# Altium PCB ika_pcb.PcbDoc (part 1 of 3)
Units mil, origin at the board's own origin, x right, y up, seen from the top; angles counter-clockwise.
Board outline 5430 x 4360 mil, 2 copper layers (Top Layer, Bottom Layer); 129 components, 109 nets, 436 pads, 110 vias.
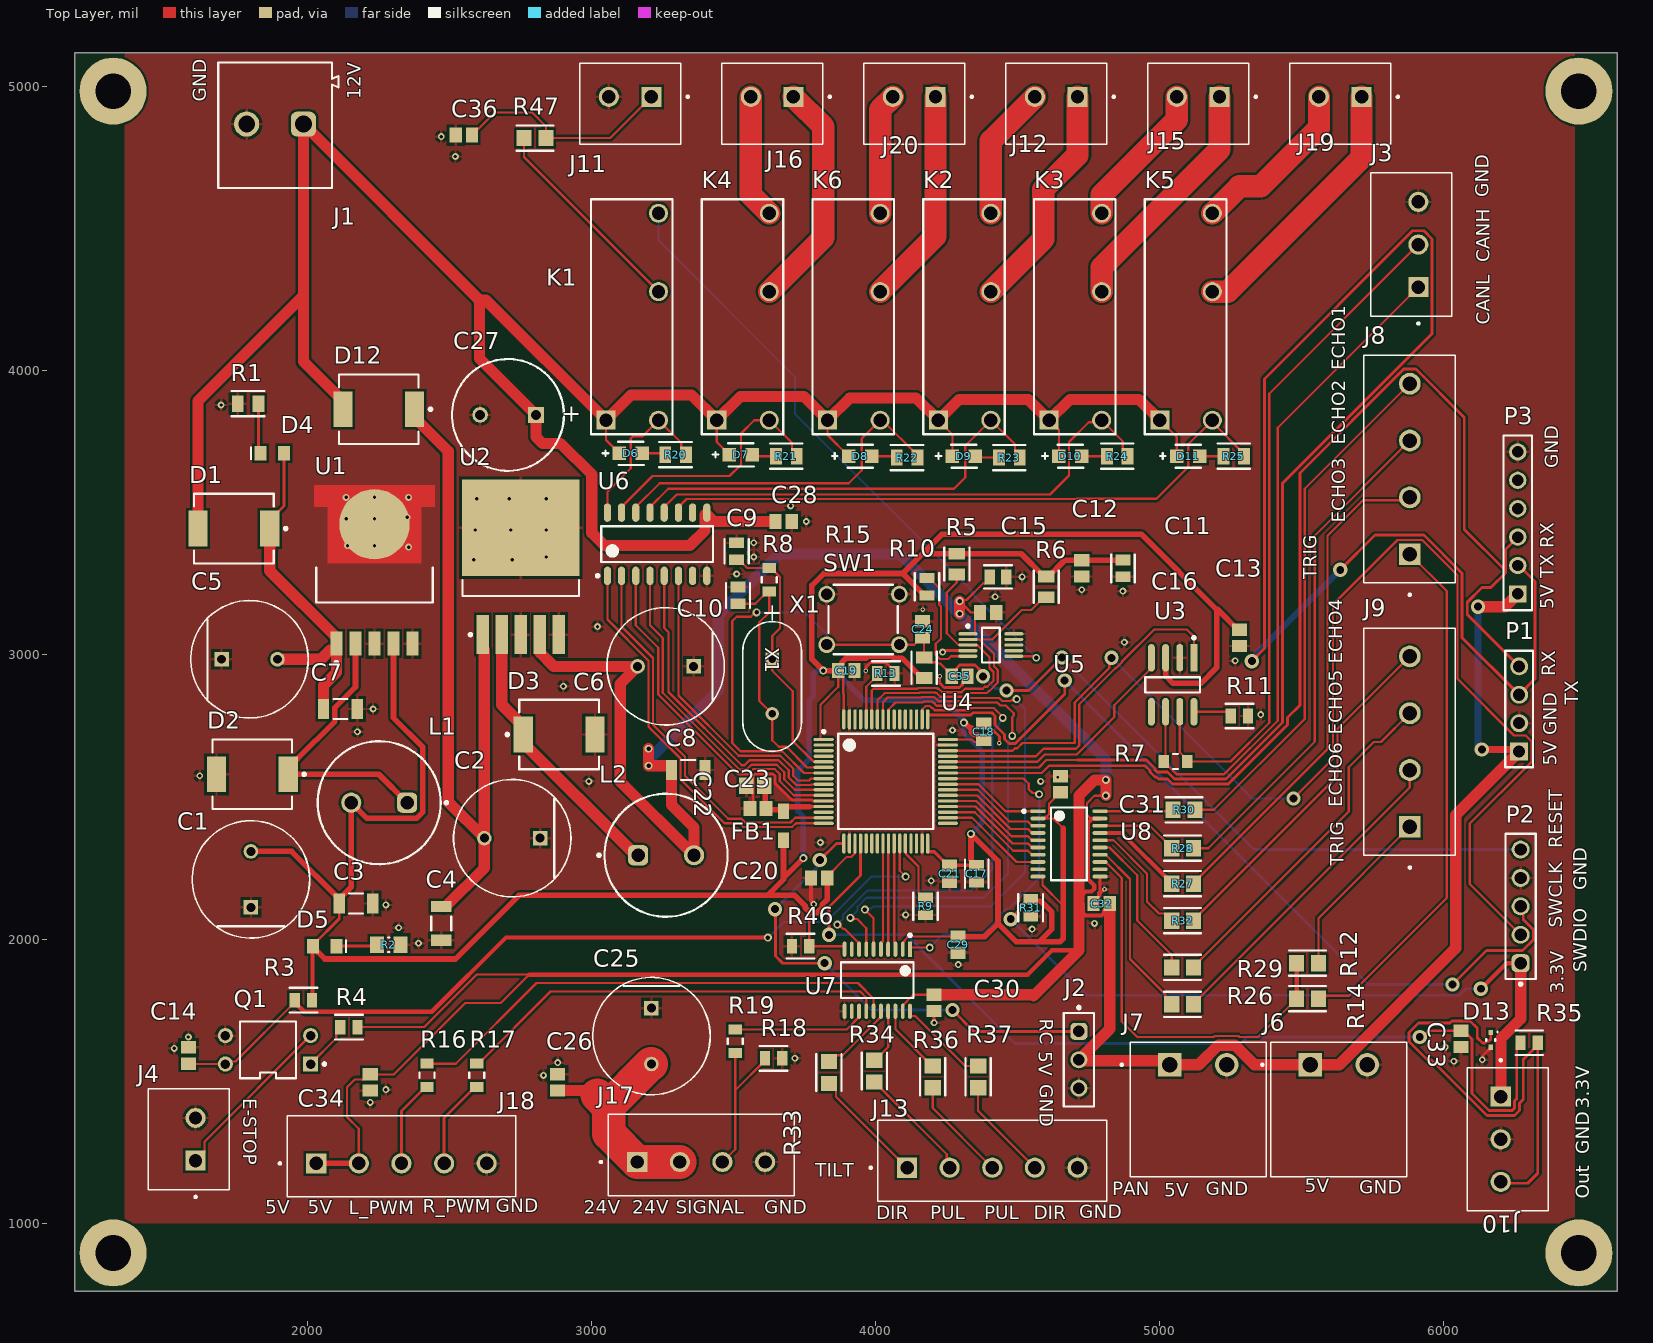
[diagram p0: Top Layer view]
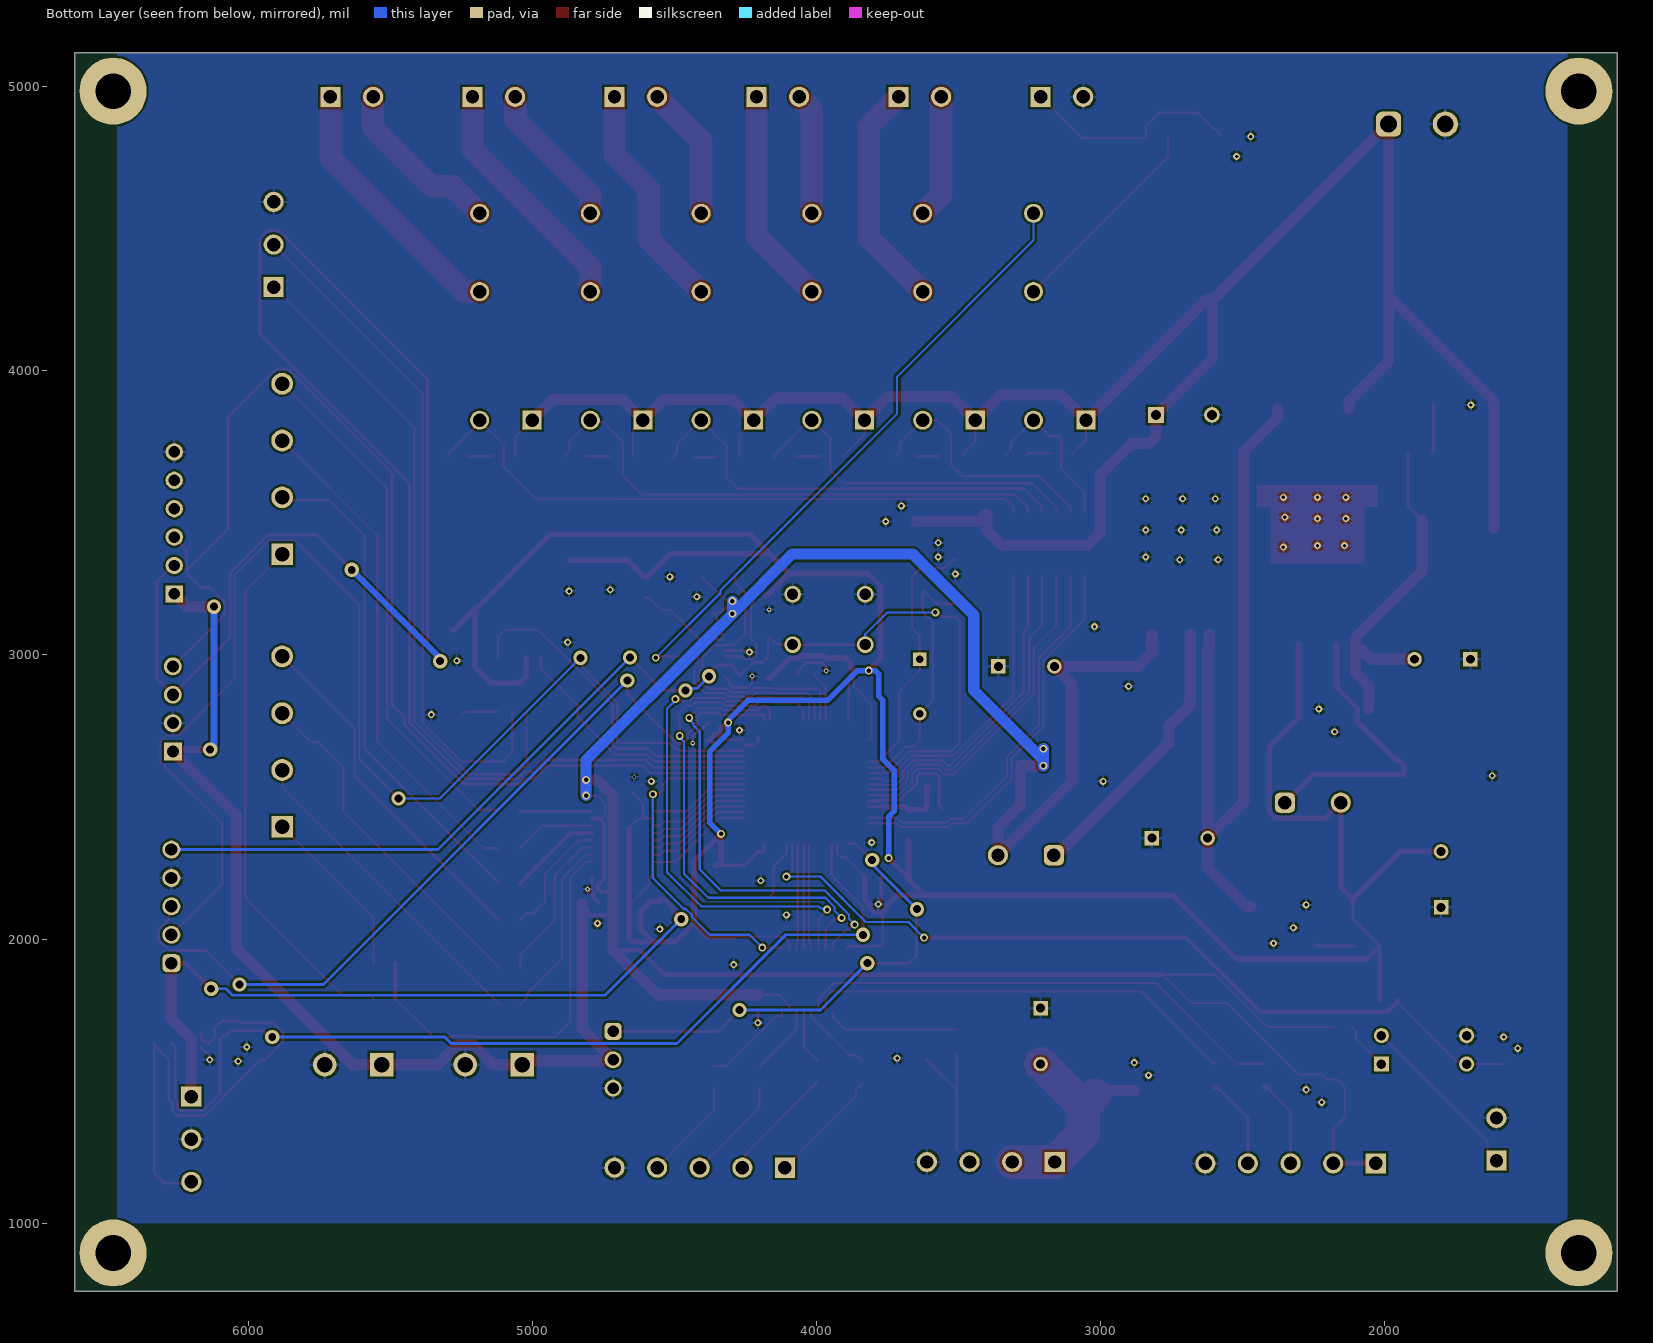
[diagram p1: Bottom Layer view, seen from below]
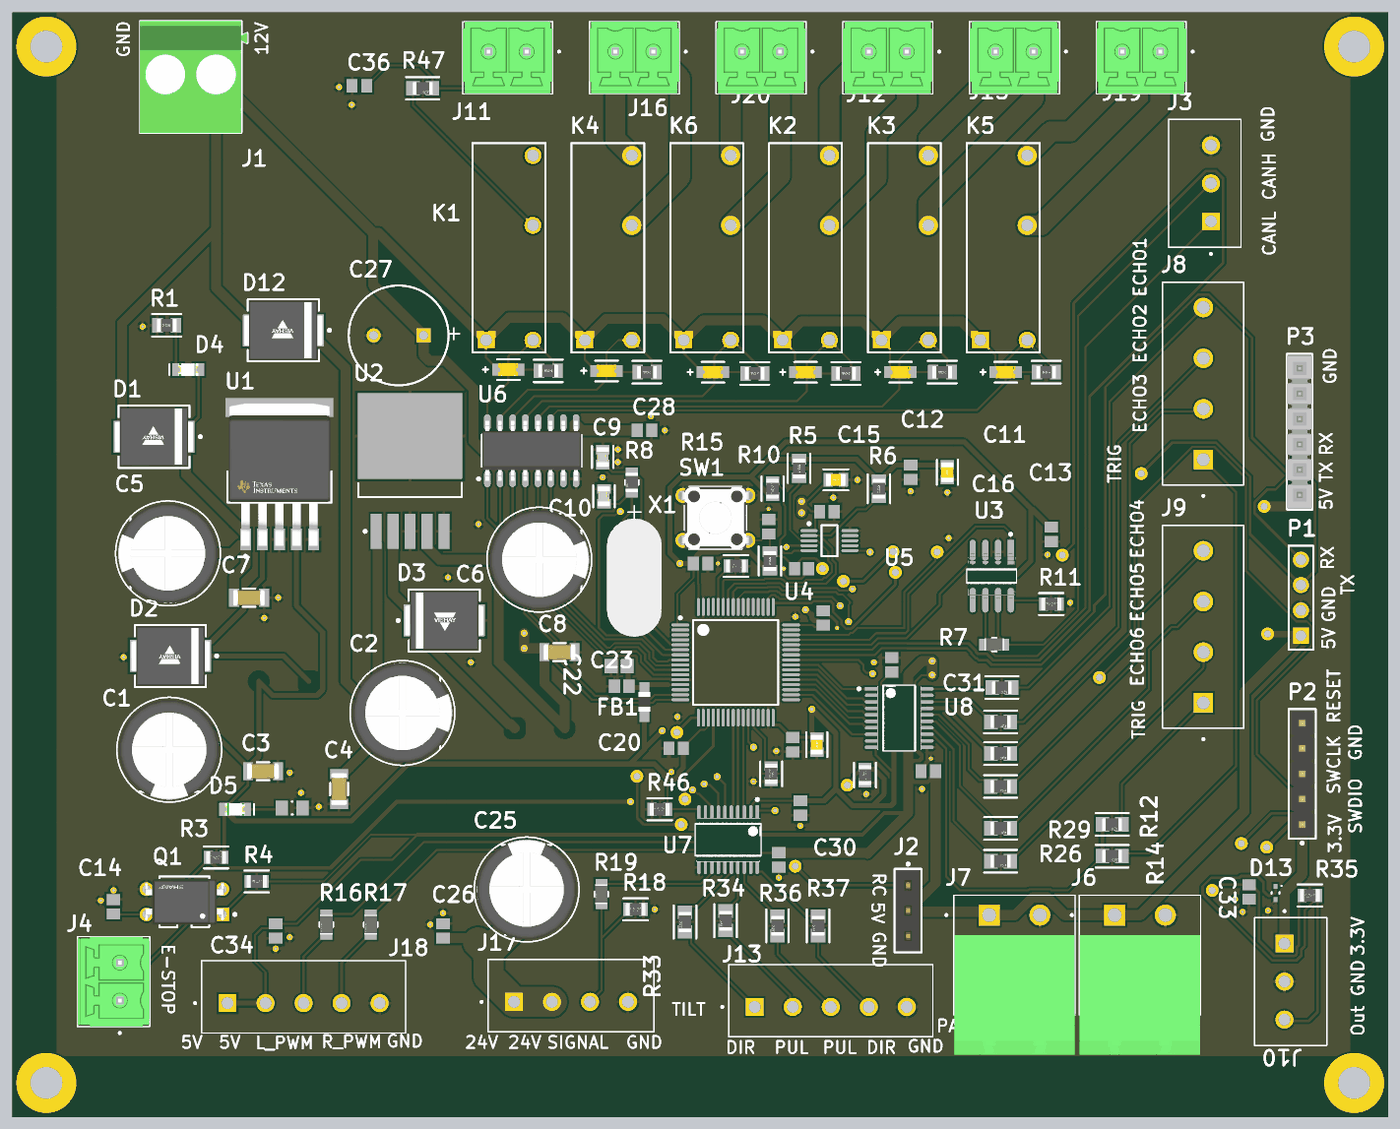
[diagram p3: 3D render of the assembled board from above, using the file's embedded part models]

## Layer stack, top to bottom
Top Solder: solder mask 0.4, Solder Resist, Dk 3.5
Top Layer: signal copper 1.4
Dielectric 1: dielectric 12.6, FR-4, Dk 4.8
Bottom Layer: signal copper 1.4
Bottom Solder: solder mask 0.4, Solder Resist, Dk 3.5

## Board outline
1180,760 6610,760 6610,5120 1180,5120

## Design rules (kind name [scope] priority, off if disabled: settings)
Clearance [All] p1: gap=7.87 ignorepadtopadclearanceinfootprint=FALSE
ComponentClearance [NOT (InComponent('J6') OR InComponent('J7') OR InComponent('J8') OR InComponent('J9'))] p1: gap=10 collisioncheckmode=3 verticalgap=10 showdistances=FALSE
HoleSize [All] p1: absolutevalues=TRUE maxlimit=196.85 minlimit=1 maxpercent=80.000 minpercent=20.000
MinimumSolderMaskSliver [All] p1: minsoldermaskwidth=0
PolygonConnect [All] p1: connectstyle=Relief reliefconductorwidth=10 reliefentries=4 polygonreliefangle="90 Angle" airgapwidth=10
RoutingVias [All] p1: holewidth=28 width=50 viastyle="Through Hole" minholewidth=28 minwidth=50 maxholewidth=28 maxwidth=50
SilkToSilkClearance [All] p1: silktosilkclearance=0
SilkToSolderMaskClearance [IsPad] p1: minsilkscreentomaskgap=0 clearancetoexposedcopper=TRUE
SolderMaskExpansion [All] p1: expansion=0 istentingtop=FALSE
SupplyNets "Schematic Supply Nets" [InNet('GND')] p1: voltage=0.000
Width [All] p1: maxlimit=118.11 minlimit=4 preferedwidth=40 minimp=50.000000 maximp=50.000000 favimp=50.000000
25 further rules are at their usual default settings.

## Components (designator, comment, footprint, x,y, rotation, side; value= is the part's Value field where it differs from the comment)
C1 "ECA1HHG331B" FP-RAD-TH-D_10_0_5-L_16_1-MFG 1800,2210 r90 top
C2 "EEUFM1E681" FP-RAD-TH-D_10_0_5-L_20_2-MFG 2720,2355 r180 top
C3 "CC1206KPX7R9BB104" FP-CC1206-1_25-MFG 2170,2125 r0 top value="100 nF"
C4 "CC1206KPX7R9BB104" FP-CC1206-1_25-MFG 2470,2055 r270 top value="100 nF"
C5 "EEUFM1E681" FP-RAD-TH-D_10_0_5-L_20_2-MFG 1795,2985 r0 top
C6 "ECA1HHG331B" FP-RAD-TH-D_10_0_5-L_16_1-MFG 3260,2960 r180 top
C7 "CC1206KPX7R9BB104" FP-CC1206-1_25-MFG 2115,2810 r0 top value="100 nF"
C8 "CC1206KPX7R9BB104" FP-CC1206-1_25-MFG 3340,2595 r0 top value="100 nF"
C9 "C0805C220K3HACTU" FP-C0805C-DN-MFG 3510,3365 r270 top value="22 pF"
C10 "C0805C220K3HACTU" FP-C0805C-DN-MFG 3515,3210 r270 top value="22 pF"
C11 "C0805C106J8RACAUTO" FP-C0805C106J8RACAUTO-MFG 4870,3305 r270 top
C12 "VJ0805Y104MXAMT" CAPC2013X145X48LL20T23 4725,3305 r90 top
C13 "VJ0805Y104MXAMT" CAPC2013X145X48LL20T23 5280,3060 r270 top
C14 "100 nF" CAPC2013X145X48LL20T23 1580,1590 r270 top
C15 "C0805C106J8RACAUTO" FP-C0805C106J8RACAUTO-MFG 4430,3275 r0 top
C16 "VJ0805Y104MXAMT" CAPC2013X145X48LL20T23 4395,3150 r180 top
C17 "C0805C106J8RACAUTO" FP-C0805C106J8RACAUTO-MFG 4355,2230 r270 top
C18 "VJ0805Y104MXAMT" CAPC2013X145X48LL20T23 4380,2730 r270 top
C19 "100 nF" CAPC2013X145X48LL20T23 3896.46,2945 r180 top
C20 "VJ0805Y104MXAMT" CAPC2013X145X48LL20T23 3800,2215 r0 top
C21 "VJ0805Y104MXAMT" CAPC2013X145X48LL20T23 4260,2230 r90 top
C22 "C0805C105J3RACTU" CAPC2013X145X50NL20T25 3575,2540 r0 top
C23 "08051C103JAT2A" CAPC2013X94X50LL20T25 3585,2460 r0 top
C24 "VJ0805Y104MXAMT" CAPC2013X145X48LL20T23 4165,3090 r270 top
C25 "EEUFK1V102L" FP-RAD-TH-D_10_0_5-L_30_2-MFG 3210,1658.43 r270 top
C26 "100nF" CAPC2013X145X48LL20T23 2880,1495 r270 top
C27 "ECA-2AM101" CAPPR65-500-1600X1000X1700 2705,3845 r180 top
C28 "VJ0805Y104MXAMT" CAPC2013X145X48LL20T23 3675,3470 r180 top
C29 "VJ0805Y104MXAMT" CAPC2013X145X48LL20T23 4290,1980 r90 top
C30 "VJ0805Y104MXAMT" CAPC2013X145X48LL20T23 4205,1775 r90 top
C31 "VJ0805Y104MXAMT" CAPC2013X145X48LL20T23 4650,2545 r270 top
C32 "VJ0805Y104MXAMT" CAPC2013X145X48LL20T23 4795,2125 r0 top
C33 "VJ0805Y104MXAMT" CAPC2013X145X48LL20T23 6060,1648.54 r90 top
C34 "100nF" CAPC2013X145X48LL20T23 2220,1495 r270 top
C35 "08053D105MAT2A" CAPC2013X140X50LL20T25 4295,2925 r180 top
C36 "VJ0805Y104MXAMT" CAPC2013X145X48LL20T23 2550,4830 r0 top
D1 "SS34-E3/9AT" FP-SMC-MFG 1740,3445 r180 top
D2 "SS34-E3/9AT" FP-SMC-MFG 1805,2580 r180 top
D3 "SS34-E3/9AT" FP-SMC-MFG 2885,2720 r0 top
D4 "150080SS75000" WL-SMCW_0805_150080xx75000 1875,3710 r0 top
D5 "150080GS75000" WL-SMCW_0805_150080xx75000 2060,1975 r180 top
D6 "SM0805YCL" FP-SM0805YCL-MFG 3137.5,3710 r0 top
D7 "SM0805YCL" FP-SM0805YCL-MFG 3525,3705 r0 top
D8 "SM0805YCL" FP-SM0805YCL-MFG 3945,3700 r0 top
D9 "SM0805YCL" FP-SM0805YCL-MFG 4310,3700 r0 top
D10 "SM0805YCL" FP-SM0805YCL-MFG 4685,3700 r0 top
D11 "SM0805YCL" FP-SM0805YCL-MFG 5100,3700 r0 top
D12 "SS34-E3/9AT" FP-SMC-MFG 2250,3865 r180 top
D13 "ESD5Z3.3T1G" ONSC-SOD-523-2-502-01_V 6165,1645 r270 top
FB1 "742792040" WE-CBF_0805_L2W1.2H0.9_HC 3675,2398.82 r90 top
J1 "691253510002" 691253510002 1885,4865 r180 top
J2 "61300311821" 61300311821 4715,1575 r270 top
J3 "1803439" PHOENIX_1803439 6028.11,4192.64 r90 top
J4 "1803426" PHOENIX_1803426 1723.11,1117.64 r90 top
J6 "1736036" PHOENIX_1736036 5630,1400 r0 top
J7 "1736036" PHOENIX_1736036 5135,1400 r0 top
J8 "1729144" PHOENIX_1729144 6039.45,3255 r90 top
J9 "1729144" PHOENIX_1729144 6039.45,2295 r90 top
J10 "1803439" PHOENIX_1803439 6081.89,1547.36 r270 top
J11 "1803426" PHOENIX_1803426 3312.36,5083.11 r180 top
J12 "1803426" PHOENIX_1803426 4812.36,5083.11 r180 top
J13 "1803455" PHOENIX_1803455 4007.64,1076.89 r0 top
J15 "1803426" PHOENIX_1803426 5312.36,5083.11 r180 top
J16 "1803426" PHOENIX_1803426 3812.36,5083.11 r180 top
J17 "1803442" PHOENIX_1803442 3057.64,1096.89 r0 top
J18 "1803455" PHOENIX_1803455 1927.64,1091.89 r0 top
J19 "1803426" PHOENIX_1803426 5812.36,5083.11 r180 top
J20 "1803426" PHOENIX_1803426 4312.36,5083.11 r180 top
K1 "ALDP112W" PNSC-LD-P-4-2050x720x1530_V 3049.96,3826.65 r90 top
K2 "ALDP112W" PNSC-LD-P-4-2050x720x1530_V 4219.96,3826.65 r90 top
K3 "ALDP112W" PNSC-LD-P-4-2050x720x1530_V 4609.96,3826.65 r90 top
K4 "ALDP112W" PNSC-LD-P-4-2050x720x1530_V 3439.96,3826.65 r90 top
K5 "ALDP112W" PNSC-LD-P-4-2050x720x1530_V 4999.96,3826.65 r90 top
K6 "ALDP112W" PNSC-LD-P-4-2050x720x1530_V 3829.96,3826.65 r90 top
L1 "7447471330" WE-TIS_1111 -47748.43,-47520 r180 top
L2 "7447471330" WE-TIS_1111 53261.57,52295 r0 top
P1 "PHT-104-01-L-S" SMTC-PHT-104-01-X-S 6265,2660 r90 top
P2 "61300511121" 61300511121 6270,2115 r90 top
P3 "TSW-106-23-F-S" SMTC-TSW-106-23-X-S 6260,3215 r90 top
Q1 "PC817X1J000F" FP-PC817X1J000F-MFG 1860,1610 r180 top
R1 "RN73R2ATTD2201B10" FP-RN73R2A-IPC_B 1790,3885 r0 top
R2 "470R 5% 0805(2012)" RESC0805(2012)_M 2285,1980 r180 top value="470.00 Ohm"
R3 "CRGCQ0805J10K" FP-CRGCQ0805-IPC_C 1985,1785 r180 top value=10KΩ
R4 "CRGCQ0805F1K0" FP-CRGCQ0805-IPC_C 2145,1690 r180 top value=1KΩ
R5 "RN73R2ATTD2201B10" FP-RN73R2A-IPC_B 4285,3320 r90 top
R6 "RN73R2ATTD2201B10" FP-RN73R2A-IPC_B 4600,3240 r90 top
R7 "AC0805JR-07120RL" FP-AC0805-MFG 5055,2625 r0 top value=120Ω
R8 "AF0805FR-071ML" FP-AF0805-MFG 3625,3265 r270 top
R9 "CRGCQ0805J10K" FP-CRGCQ0805-IPC_C 4175,2115 r270 top value=10KΩ
R10 "CRGCQ0805F100K" FP-CRGCQ0805-IPC_C 4180,3240 r270 top value=100KΩ
R11 "CRGCQ0805J10K" FP-CRGCQ0805-IPC_C 5280,2785 r180 top value=10KΩ
R12 "RMCF0805FT100R" FP-RMCF0805-IPC_A 5520,1915 r0 top
R13 "CRGCQ0805J10K" FP-CRGCQ0805-IPC_C 4035.55,2935 r0 top value=10KΩ
R14 "RMCF0805FT100R" FP-RMCF0805-IPC_A 5520,1790 r0 top
R15 "RN73R2ATTD2201B10" FP-RN73R2A-IPC_B 4170,2955 r90 top
R16 "AC0805FR-07220RL" FP-AC0805-MFG 2420,1520 r270 top value=220Ω
R17 "AC0805FR-07220RL" FP-AC0805-MFG 2595,1520 r270 top value=220Ω
R18 "CRGCQ0805J10K" FP-CRGCQ0805-IPC_C 3640,1580 r180 top value=10KΩ
R19 "AC0805FR-07220RL" FP-AC0805-MFG 3505,1640 r270 top value=220Ω
R20 "RN73R2ATTD2201B10" FP-RN73R2A-IPC_B 3295,3705 r180 top
R21 "RN73R2ATTD2201B10" FP-RN73R2A-IPC_B 3685,3700 r180 top
R22 "RN73R2ATTD2201B10" FP-RN73R2A-IPC_B 4110,3695 r180 top
R23 "RN73R2ATTD2201B10" FP-RN73R2A-IPC_B 4470,3695 r180 top
R24 "RN73R2ATTD2201B10" FP-RN73R2A-IPC_B 4850,3700 r180 top
R25 "RN73R2ATTD2201B10" FP-RN73R2A-IPC_B 5260,3700 r180 top
R26 "RMCF0805FT100R" FP-RMCF0805-IPC_A 5080,1770 r0 top
R27 "RMCF0805FT100R" FP-RMCF0805-IPC_A 5080,2195 r0 top
R28 "RMCF0805FT100R" FP-RMCF0805-IPC_A 5080,2320 r0 top
R29 "RMCF0805FT100R" FP-RMCF0805-IPC_A 5080,1900 r0 top
R30 "RMCF0805FT100R" FP-RMCF0805-IPC_A 5085,2455 r0 top
R31 "CRGCQ0805J10K" FP-CRGCQ0805-IPC_C 4545,2110 r90 top value=10KΩ
R32 "RMCF0805FT100R" FP-RMCF0805-IPC_A 5080,2065 r0 top
R33 "RMCF0805FT100R" FP-RMCF0805-IPC_A 3835,1530 r270 top
R34 "RMCF0805FT100R" FP-RMCF0805-IPC_A 3995,1535 r270 top
R35 "CRGCQ0805F1K0" FP-CRGCQ0805-IPC_C 6300,1635 r180 top value=1KΩ
R36 "RMCF0805FT100R" FP-RMCF0805-IPC_A 4200,1515 r270 top
R37 "RMCF0805FT100R" FP-RMCF0805-IPC_A 4360,1515 r270 top
R46 "CRGCQ0805J10K" FP-CRGCQ0805-IPC_C 3735,1975 r180 top value=10KΩ
R47 "RMCF0805FT100R" FP-RMCF0805-IPC_A 2800,4820 r0 top
SW1 "430156043736" 430156043736 3955,3125 r0 top
U1 "LM2596SX-3.3/NOPB" FP-KTT0005B-MFG 2235,3360.08 r0 top
U2 "LM2596SX-5.0" TS5B_M 2750,3310 r90 top
U3 "SN65HVD230DR" FP-D0008A-IPC_A 5045,2895 r270 top
U4 "STM32F103RET6" STM-LQFP64_N 4035,2555 r0 top
U5 "MCP4728-E/UN" MSOP-UN10_N 4405,3035 r0 top
U6 "ULN2003ADR" D0016A_M 3230,3390 r90 top
U7 "TXS0108EPWR" FP-PW0020A-IPC_C 4005,1855 r270 top
U8 "TXS0108EPWR" FP-PW0020A-IPC_C 4680,2335 r0 top
X1 "AS-8.000-18-SP" XTAL_AS_SP_RAL 3635,2985 r270 top

## Footprints (in the part's own frame and the unit in brackets; to place one, negate y for a bottom-side part, rotate by r counter-clockwise, add the part's x,y. Pads: shape width x height; smd on the part's side, far side on the other; paste and mask are expansions set on the pad)
61300311821 [mm] "Socket Header, Pitch 2.54 mm, THT, Vertical, single row, 3p"
  rrect50% 1.52x1.52 hole 1.02: 1(-2.54,0)
  round 1.52 hole 1.02: 2(0,0) 3(2.54,0)
  silkscreen extent -4.79,-1.35 4.19,1.35, body extent -4.06,-1.25 4.06,1.25, height 8.55
61300511121 [mm] "Pin Header, pitch 2.54 mm, THT, Vertical, single row, 5p"
  rrect50% 1.6x1.6 hole 1.1: 1(-5.08,0)
  round 1.6 hole 1.1: 2(-2.54,0) 3(0,0) 4(2.54,0) 5(5.08,0)
  silkscreen extent -7.07,-1.35 6.5,1.35, body extent -6.35,-1.27 6.35,1.27, height 8.57
430156043736 [mm] "6x6mm Tact Switch, THT version"
  round 1.5 hole 1: A1(-3.25,2.25) A2(3.25,2.25) B1(-3.25,-2.25) B2(3.25,-2.25)
  silkscreen extent -3.1,-3.1 3.1,3.1, body extent -3.95,-3.1 3.95,3.1, height 4.35
691253510002 [mm] "Serie 2535 - 5.08 mm _ 2 pins"
  rrect50% 2.25x2.25 hole 1.5: 1(-2.54,-0.1)
  round 2.25 hole 1.5: 2(2.54,-0.1)
  silkscreen extent -5.67,-5.6 5.08,5.6, body extent -5.67,-5.6 5.09,5.6, height 18.1
CAPC2013X94X50LL20T25 [mm] "Chip Capacitor, 2-Leads, Body 2.01x1.25mm, IPC High Density"
  rect 1.15x1.35 smd: 1(-0.725,0) 2(0.725,0)
  body extent -1.1,-0.72 1.1,0.72, height 0.94
CAPC2013X140X50LL20T25 [mm] "Chip Capacitor, 2-Leads, Body 2.00x1.25mm, IPC High Density"
  rect 1.1x1.35 smd: 1(-0.7,0) 2(0.7,0)
  body extent -1.1,-0.72 1.1,0.72, height 1.4
CAPC2013X145X48LL20T23 [mm] "Chip Capacitor, 2-Leads, Body 2.00x1.25mm, IPC High Density"
  rect 1.1x1.35 smd: 1(-0.725,0) 2(0.725,0)
  body extent -1.1,-0.72 1.1,0.72, height 1.45
CAPC2013X145X50NL20T25 [mm] "Chip Capacitor, 2-Leads, Body 2.00x1.25mm, IPC Medium Density"
  rect 1.3x1.45 smd: 1(-0.8,0) 2(0.8,0)
  body extent -1.1,-0.72 1.1,0.72, height 1.45
CAPPR65-500-1600X1000X1700 [mm] "THD, 2-Leads, Dia 10mm, Body Length 16mm"
  rect 1.4x1.4 hole 0.9: 1(-2.5,0)
  round 1.4 hole 0.9: 2(2.5,0)
  silkscreen extent -5,-5 5,5, body extent -5,-5 5,5, height 17
D0016A_M [mm] "SOIC, 16-Leads, Body 10x4mm, Pitch 1.27mm, IPC Low Density"
  oval 1.65x0.65 smd: 1(-2.825,4.445) 2(-2.825,3.175) 3(-2.825,1.905) 4(-2.825,0.635) 5(-2.825,-0.635) 6(-2.825,-1.905) 7(-2.825,-3.175) 8(-2.825,-4.445) 9(2.825,-4.445) 10(2.825,-3.175) 11(2.825,-1.905) 12(2.825,-0.635) 13(2.825,0.635) 14(2.825,1.905) 15(2.825,3.175) 16(2.825,4.445)
  silkscreen extent -2.95,-5 1.6,5.44, body extent -3,-4.95 3,4.95, height 1.59
FP-AC0805-MFG [mm]
  rect 0.9x1.2 smd paste+0 mask+0: 1(-1.05,0) 2(1.05,0)
  silkscreen extent -0.23,-0.67 0.23,0.67, body extent -1.6,-0.77 1.6,0.77, height 0.25
FP-AF0805-MFG [mm]
  rect 0.9x1.2 smd paste+0 mask+0: 1(-1.05,0) 2(1.05,0)
  silkscreen extent -0.23,-0.67 0.23,0.67, body extent -1.6,-0.77 1.6,0.77, height 0.25
FP-C0805C106J8RACAUTO-MFG [mm]
  rect 0.95x1.35 smd paste+0 mask+0: 1(-0.75,0) 2(0.75,0)
  silkscreen extent -1.25,-1.05 1.25,1.05, body extent -1.4,-0.85 1.4,0.85, height 0.25
FP-C0805C-DN-MFG [mm]
  rect 0.95x1.35 smd paste+0 mask+0: 1(-0.75,0) 2(0.75,0)
  silkscreen extent -1.1,-1.07 1.1,1.07, body extent -1.4,-0.85 1.4,0.85, height 0.25
FP-CC1206-1_25-MFG [mm]
  rect 1x1.8 smd paste+0 mask+0: 1(-1.5,0) 2(1.5,0)
  silkscreen extent -0.63,-0.9 0.63,0.9, body extent -2.2,-1.25 2.2,1.25, height 0.25
FP-CRGCQ0805-IPC_C [mil]
  rect 35.67x51.57 smd paste+0 mask+0: 1(-30.55,0) 2(30.55,0)
  silkscreen extent -48,-43 48,43, body extent -52,-31 52,31, height 10
FP-D0008A-IPC_A [mil]
  rect 97.21x24.49 smd paste+0 mask+0: 1(-95.02,75)
  rrect100% 97.21x24.49 smd paste+0 mask+0: 2(-95.02,25) 3(-95.02,-25) 4(-95.02,-75) 5(95.02,-75) 6(95.02,-25) 7(95.02,25) 8(95.02,75)
  silkscreen extent -170,-97 27,97, body extent -163,-116 163,116, height 10
FP-KTT0005B-MFG [mm]
  rect 1.07x2.16 smd paste+0 mask+0: 1(-3.4,-8.13) 2(-1.7,-8.13) 3(0,-8.13) 4(1.7,-8.13) 5(3.4,-8.13)
  round 6.291 smd paste+0 mask+0: 6(0,2.545)
  Top Layer region: -5.4,6.04 5.4,6.04 5.4,4.13 4.165,4.13 4.165,-0.95 -4.165,-0.95 -4.165,4.13 -5.4,4.13 -5.4,6.04
  silkscreen extent -5.21,-9.95 5.21,-1.33, body extent -5.5,-9.31 5.5,6.14, height 0.25
FP-PC817X1J000F-MFG [mm]
  rect 1.35x1.35 hole 0.85 paste-2539.97 mask+0: 1(-3.81,1.27)
  round 1.35 hole 0.85 paste-2539.97 mask+0: 2(-3.81,-1.27) 3(3.81,-1.27) 4(3.81,1.27)
  silkscreen extent -5.18,-2.54 2.5,2.54, body extent -4.58,-2.64 4.58,2.64, height 0.25
FP-PW0020A-IPC_C [mm]
  rect 1.355x0.341 smd paste+0 mask+0: 1(-2.775,2.925)
  rrect100% 1.355x0.341 smd paste+0 mask+0: 2(-2.775,2.275) 3(-2.775,1.625) 4(-2.775,0.975) 5(-2.775,0.325) 6(-2.775,-0.325) 7(-2.775,-0.975) 8(-2.775,-1.625) 9(-2.775,-2.275) 10(-2.775,-2.925) 11(2.775,-2.925) 12(2.775,-2.275) 13(2.775,-1.625) 14(2.775,-0.975) 15(2.775,-0.325) 16(2.775,0.325) 17(2.775,0.975) 18(2.775,1.625) 19(2.775,2.275) 20(2.775,2.925)
  silkscreen extent -4.15,-3.25 1.6,3.25, body extent -3.55,-3.35 3.55,3.35, height 0.25
FP-RAD-TH-D_10_0_5-L_16_1-MFG [mm]
  rect 1.3x1.3 hole 0.8 paste-2539.97 mask+0: 1(-2.5,0)
  round 1.3 hole 0.8 paste-2539.97 mask+0: 2(2.5,0)
  silkscreen extent -5.25,-5.25 5.25,5.25, body extent -5.35,-5.35 5.35,5.35, height 0.25
FP-RAD-TH-D_10_0_5-L_20_2-MFG [mm]
  rect 1.3x1.3 hole 0.8 paste-2539.97 mask+0: 1(-2.5,0)
  round 1.3 hole 0.8 paste-2539.97 mask+0: 2(2.5,0)
  silkscreen extent -5.25,-5.25 5.25,5.25, body extent -5.35,-5.35 5.35,5.35, height 0.25
FP-RAD-TH-D_10_0_5-L_30_2-MFG [mm]
  rect 1.3x1.3 hole 0.8 paste-2539.97 mask+0: 1(-2.5,0)
  round 1.3 hole 0.8 paste-2539.97 mask+0: 2(2.5,0)
  silkscreen extent -5.25,-5.25 5.25,5.25, body extent -5.35,-5.35 5.35,5.35, height 0.25
FP-RMCF0805-IPC_A [mil]
  rect 53.33x57.56 smd paste+0 mask+0: 1(-38.42,0) 2(38.42,0)
  silkscreen extent -65,-45 65,45, body extent -85,-48 85,48, height 10
FP-RN73R2A-IPC_B [mil]
  rect 41.54x57.33 smd paste+0 mask+0: 1(-36.44,0) 2(36.44,0)
  silkscreen extent -57,-44 57,44, body extent -67,-39 67,39, height 10
FP-SM0805YCL-MFG [mil]
  rect 47x47 smd paste+0 mask+0: 1(-40.5,0) 2(40.5,0)
  silkscreen extent -100,-41 45,40, body extent -68,-33 68,33, height 10
FP-SMC-MFG [mm]
  rect 1.72x3.2 smd paste+0 mask+0: 1(-3.205,0) 2(3.205,0)
  silkscreen extent -4.75,-3.11 3.55,3.11, body extent -4.17,-3.21 4.17,3.21, height 0.25
MSOP-UN10_N [mm] "TSSOP, 10-Leads, Body 3x3mm, Pitch 0.5mm, IPC Medium Density"
  oval 1.7x0.3 smd: 1(-2.05,1) 2(-2.05,0.5) 3(-2.05,0) 4(-2.05,-0.5) 5(-2.05,-1) 6(2.05,-1) 7(2.05,-0.5) 8(2.05,0) 9(2.05,0.5) 10(2.05,1)
  silkscreen extent -2.17,-1.55 0.8,1.82, body extent -1.55,-1.55 1.55,1.55, height 1.1
ONSC-SOD-523-2-502-01_V [mm] "SOD, 2-Leads, Body 1.2x0.8mm"
  rect 0.48x0.4 smd: 1(-0.66,0) 2(0.66,0)
  silkscreen extent -0.75,-0.4 0.07,0.65, body extent -0.6,-0.4 0.6,0.4, height 0.7
PHOENIX_1729144 [mm]
  rect 1.95x1.95 / inner round 1.95 / far side rect 1.95x1.95 hole 1.3: 1(2.54,4.05)
  round 1.95 hole 1.3: 2(7.62,4.05) 3(12.7,4.05) 4(17.78,4.05)
  silkscreen extent -1.2,0 20.32,8.15
PHOENIX_1736036 [mm]
  rect 2.1x2.1 / inner round 2.1 / far side rect 2.1x2.1 hole 1.4: 1(-2.54,4)
  round 2.1 hole 1.4: 2(2.54,4)
  silkscreen extent -6.93,-6 6.08,6, body extent -6.04,-10 6.04,2, height 8.6
PHOENIX_1803426 [mm]
  rect 1.8x1.8 / inner round 1.8 / far side rect 1.8x1.8 hole 1.2: 01(2.6,3)
  round 1.8 hole 1.2: 02(6.41,3)
  silkscreen extent -0.75,0 9.01,7.25, body extent 0,0 9.01,7.25, height 9.2
PHOENIX_1803439 [mm]
  rect 1.8x1.8 / inner round 1.8 / far side rect 1.8x1.8 hole 1.2: 01(2.6,3)
  round 1.8 hole 1.2: 02(6.41,3) 03(10.22,3)
  silkscreen extent -0.75,0 12.82,7.25
PHOENIX_1803442 [mm]
  rect 1.8x1.8 / inner round 1.8 / far side rect 1.8x1.8 hole 1.2: 01(2.6,3)
  round 1.8 hole 1.2: 02(6.41,3) 03(10.22,3) 04(14.03,3)
  silkscreen extent -0.75,0 16.63,7.25
PHOENIX_1803455 [mm]
  rect 1.8x1.8 / inner round 1.8 / far side rect 1.8x1.8 hole 1.2: 01(2.6,3)
  round 1.8 hole 1.2: 02(6.41,3) 03(10.22,3) 04(14.03,3) 05(17.84,3)
  silkscreen extent -0.75,0 20.44,7.25
PNSC-LD-P-4-2050x720x1530_V [mm] "LD-P, 4-Leads, Body 20.5x7.2mm"
  rect 1.7x1.7 hole 1.2 mask+0.102: 1(0,0)
  round 1.7 hole 1.2 mask+0.102: 2(18.5,-4.7) 3(11.5,-4.7) 4(0,-4.7)
  silkscreen extent -1.25,-5.95 19.75,1.35, body extent -1.05,-5.85 19.45,1.35, height 15.3
RESC0805(2012)_M [mm] "Chip Resistor, Body 2.0x1.3mm, IPC Low Density"
  rect 1.25x1.5 smd: 1(-1.05,0) 2(1.05,0)
  silkscreen extent -0.05,-0.65 0.05,0.65, body extent -1.1,-0.67 1.1,0.67, height 0.7
SMTC-PHT-104-01-X-S [mm] "Press Fit Socket Assembly, 1x4 Pins, Vertical, 2.54mm Pitch, Male"
  rect 1.6x1.6 hole 1.081: 1(0,0)
  round 1.6 hole 1.081: 2(2.54,0) 3(5.08,0) 4(7.62,0)
  silkscreen extent -1.4,-1.24 9.02,1.24, body extent -1.27,-1.25 8.89,1.25, height 8.38
SMTC-TSW-106-23-X-S [mm] ".025 SQ Post Terminal Strip Assembly, 1x6 Pins, Vertical, 2.54mm Pitch, Male"
  rect 1.55x1.55 hole 1.02: 1(0,0)
  round 1.55 hole 1.02: 2(2.54,0) 3(5.08,0) 4(7.62,0) 5(10.16,0) 6(12.7,0)
  silkscreen extent -1.46,-1.27 14.16,1.27, body extent -1.27,-1.27 13.97,1.27, height 8.38
STM-LQFP64_N [mm] "Thin QFP, 64-Leads, Body 10x10mm, Pitch 0.5mm, IPC Medium Density"
  oval 1.8x0.3 smd: 1(-5.55,3.75) 2(-5.55,3.25) 3(-5.55,2.75) 4(-5.55,2.25) 5(-5.55,1.75) 6(-5.55,1.25) 7(-5.55,0.75) 8(-5.55,0.25) 9(-5.55,-0.25) 10(-5.55,-0.75) 11(-5.55,-1.25) 12(-5.55,-1.75) 13(-5.55,-2.25) 14(-5.55,-2.75) 15(-5.55,-3.25) 16(-5.55,-3.75) 33(5.55,-3.75) 34(5.55,-3.25) 35(5.55,-2.75) 36(5.55,-2.25) 37(5.55,-1.75) 38(5.55,-1.25) 39(5.55,-0.75) 40(5.55,-0.25) 41(5.55,0.25) 42(5.55,0.75) 43(5.55,1.25) 44(5.55,1.75) 45(5.55,2.25) 46(5.55,2.75) 47(5.55,3.25) 48(5.55,3.75)
  oval 0.3x1.8 smd: 17(-3.75,-5.55) 18(-3.25,-5.55) 19(-2.75,-5.55) 20(-2.25,-5.55) 21(-1.75,-5.55) 22(-1.25,-5.55) 23(-0.75,-5.55) 24(-0.25,-5.55) 25(0.25,-5.55) 26(0.75,-5.55) 27(1.25,-5.55) 28(1.75,-5.55) 29(2.25,-5.55) 30(2.75,-5.55) 31(3.25,-5.55) 32(3.75,-5.55) 49(3.75,5.55) 50(3.25,5.55) 51(2.75,5.55) 52(2.25,5.55) 53(1.75,5.55) 54(1.25,5.55) 55(0.75,5.55) 56(0.25,5.55) 57(-0.25,5.55) 58(-0.75,5.55) 59(-1.25,5.55) 60(-1.75,5.55) 61(-2.25,5.55) 62(-2.75,5.55) 63(-3.25,5.55) 64(-3.75,5.55)
  silkscreen extent -5.67,-4.25 4.25,4.57, body extent -5,-5 5,5, height 1.6
TS5B_M [mm] "D2-PAK, 6-Leads, Body 8.6x10.2mm, Pitch 1.7mm, Lead Span 14.1mm, IPC Low Density"
  rect 3.5x1.1 smd: 1(-6.05,3.4) 2(-6.05,1.7) 3(-6.05,0) 4(-6.05,-1.7) 5(-6.05,-3.4)
  rect 8.6x10.5 smd: 6(3.5,0)
  silkscreen extent -6.17,-5.2 -1.2,5.2, body extent -2.6,-5.2 6.29,5.2, height 4.65
WE-CBF_0805_L2W1.2H0.9_HC [mm] "SMD EMI Suppression Ferrite  Bead, body 2.00x1.20mm"
  rect 1.4x1 smd: 1(-1.3,0) 2(1.3,0)
  body extent -1,-0.6 1,0.6, height 0.9
WE-TIS_1111 [mm] "THT Shielded Radial Leaded Wire Wound Inductor, body diameter 11mm"
  rrect50% 1.8x1.8 hole 1.2: 1(-1272.5,-1270)
  round 1.8 hole 1.2: 2(-1267.5,-1270)
  silkscreen extent -1276.13,-1275.5 -1264.5,-1264.5, body extent -1275.3,-1275.3 -1264.7,-1264.7, height 10.6
WL-SMCW_0805_150080xx75000 [mm] "SMD Mono-color Chip LED, body 2.0x1.25mm"
  rect 1.1x1.3 smd: 1(-1.05,0) 2(1.05,0)
  silkscreen extent -2,-0.6 -1.8,0.6, body extent -1,-0.63 1,0.62, height 0.7
XTAL_AS_SP_RAL [mil]
  rect 47x47 hole 27 paste-99999 mask+0: 1(0,0)
  round 47 hole 27 paste-99999 mask+0: 2(192,0)
  silkscreen extent -188,-104 324,104, body extent -137,-108 329,108, height 138

## Part data
C1 C6: library part CMP-05427-000698-1, "Aluminum Electrolytic Capacitors (Radial Lead Type) AEC-Q200 Qualified 330uF ±20% 50V", Capacitance=330uF, Case/Package=Radial, Max Operating Temperature=105°C, Min Operating Temperature=-55°C, Package Quantity=500, Ripple Current=410mA, Tolerance=20%, Voltage Rating (DC)=50V, Construction=RADIAL, Contact Plating=Tin, Diameter=10mm, Height=16mm, Lead Diameter=0.6mm, Lead Pitch=5mm, Lead/Base Style=Straight, Length=16mm, Life (Hours)=2000Hour, Mount="Through Hole", Packaging="Ammo Pack", Radiation Hardening=No, RoHS Compliant=Yes, Series=NHG, Termination=Radial
C2 C5: library part CMP-05427-000865-1, "Aluminum Electrolytic Capacitors (Radial Lead Type) 680uF ±20% 25V", Capacitance=680uF, Case/Package=Radial, Dielectric Material=Aluminium, ESR (Equivalent Series Resistance)=19mR, Max Operating Temperature=105°C, Min Operating Temperature=-40°C, Package Quantity=200, Ripple Current=2.18A, Tolerance=20%, Voltage=25V, Construction=RADIAL, Diameter=10mm, Dissipation Factor=0.14%, Height=20mm, Height - Seated (Max)=0.866inch, Lead Diameter=0.6mm, Lead Free="Lead Free", Lead Pitch=5mm, Length=20mm, Life (Hours)=5000Hour, Mount="Through Hole", Packaging=Bulk, Polarity=Polar, Radiation Hardening=No, REACH SVHC="No SVHC", RoHS Compliant=Yes, Series=FM, Termination=Radial, Voltage Rating=25V, Voltage Rating (DC)=25V, Impedance=19mR
C3 C4 C7 C8: library part CMP-03422-000130-1, "CC1206 100 nF X7R 10.00%50 V", Capacitance="100 nF", Manufacturer=Yageo, Package=CC1206-1.25, Temperature="-55°C to +125°C", Temperature Characteristic=X7R, Temperature Coefficient=15%, Temperature Range High=+125°C, Temperature Range Low=-55°C, Tolerance=0.1, Voltage Rating="50 V", Automotive=No, Automotive Grade=NA, Category=Cap, ComponentLink2Description=Datasheet, ComponentLink2URL=http://www.yageo.com/documents/recent/UPY-NP0X7R_HV_1KV-to-3KV_11.pdf, Device Class L1="Passive Components", Device Class L2=Capacitors, Device Class L3="Ceramic Capacitors", Footprint Url=http://www.yageo.com/exep/pages/download/literatures/UPY-C_GEN_24.pdf, Height=1.45mm, Lead Free=Yes, Manufacturer Part Number=CC1206KPX7R9BB104, Material=Ceramic, Mouser Description="Surface Mount Ceramic Multilayer Capacitor 0.1uF 10% X7R 50V 1206 Paper T/R", Octopart=https://octopart.com/cc1206kpx7r9bb104-yageo-16251820, RoHS=TRUE
C9 C10: library part CMP-03020-002873-1, "C0805 22 pF X8R 30ppm/°C 10.00% 25 V", Capacitance="22 pF", Manufacturer=KEMET, Package=C0805C-DN, Temperature="-55°C to +125°C", Temperature Characteristic=X8R, Temperature Coefficient=30ppm/°C, Temperature Range High=+125°C, Temperature Range Low=-55°C, Tolerance=0.1, Voltage Rating="25 V", Automotive=No, Category=Cap, ComponentLink2Description=Datasheet, ComponentLink2URL=https://content.kemet.com/datasheets/KEM_C1003_C0G_SMD.pdf, Device Class L1="Passive Components", Device Class L2=Capacitors, Device Class L3="Ceramic Capacitors", Height=0.88mm, Lead Free=Yes, Manufacturer Part Number=C0805C220K3HACTU, Material=Ceramic, Octopart=https://octopart.com/c0805c220k3hactu-kemet-88697045, RoHS=TRUE, Ipc Land Pattern Name=CAPC200125X78
C11 C15 C17: library part CMP-03020-034708-1, "CAP CER 10UF 10V X7R 0805", Capacitance=10uF, Case Code (Metric)=2012, Case Code (Imperial)=0805, Max Operating Temperature=125°C, Min Operating Temperature=-55°C, Ratings=AEC-Q200, Tolerance=5%, Voltage Rating=10V, Case/Package=0805, Mount="Surface Mount", Packaging="Tape and Reel", RoHS Compliant=Yes
C12 C13 C16 C18 C20 C21 C24 C28 C29 C30 C31 C32 C33 C36: library part CMP-2007-01796-1, Manufacturer=Vitramon, Part Number=VJ0805Y104MXAMT
C14 C19 C26 C34: library part CMP-2007-01796-1, Manufacturer=Vitramon, Part Number=VJ0805Y104MXAMT
C22: library part CMP-2007-01121-1, Manufacturer=Kemet, Part Number=C0805C105J3RACTU
C23: library part CMP-2007-04163-1, Manufacturer="AVX Interconnect / Elco", Part Number=08051C103JAT2A
C25: library part CMP-05427-000707-1, "Aluminum Electrolytic Capacitors (Radial Lead Type) AEC-Q200 Qualified 1000uF ±20% 35V", Capacitance=1mF, Case/Package=Radial, Dielectric Material=Aluminium, Max Operating Temperature=105°C, Min Operating Temperature=-55°C, Package Quantity=100, Ripple Current=2.14A, Tolerance=20%, Voltage=35V, Construction=RADIAL, Contact Plating=Tin, Diameter=10mm, Dissipation Factor=0.12%, Height=30mm, Lead Diameter=0.6mm, Lead Pitch=5mm, Lead/Base Style=Straight, Length=30mm, Life (Hours)=4000Hour, Mount="Through Hole", Packaging=Bulk, Radiation Hardening=No, REACH SVHC="No SVHC", RoHS Compliant=Yes, Series=FK, Termination=Radial, Voltage Rating=35V, Voltage Rating (DC)=35V
C27: library part CMP-1665-00044-1, "Aluminum Electrolytic Capacitor, 100 uF, +/- 20%, 100 V, -40 to 85 degC, 2-Pin THD, RoHS, Bulk", Case\Package=Axial, Max Operating Temperature="155 degC", Min Operating Temperature="-55 degC", Package Quantity=200, Power Rating="250 mW", Resistance="100 Ohm", Tolerance=1%, Type (Resistor)="Carbon Film", Voltage Rating="250 V", ComponentLink1Description="Manufacturer URL", ComponentLink1URL=http://www.panasonic.com/, ComponentLink2Description=Datasheet, ComponentLink2URL=https://industrial.panasonic.com/cdbs/www-data/pdf/RDF0000/ABA0000C1047.pdf, DatasheetVersion=Mar-16, Length="0.248 inch", Mount="Through Hole", PackageDescription="2-Pin Through Hole Device, Dia 10 mm, Body Length 16 mm", PackageReference=CAPPR65-500-1600X1000X1700, Packaging=Bulk, RoHSCompliant=true
C35: library part CMP-2007-04611-1, Manufacturer="AVX Interconnect / Elco", Part Number=08053D105MAT2A
D1 D2 D3 D12: library part CMP-02539-000066-1, "DIODE SCHOTTKY 40V 3A DO214AB", Average Rectified Current=3A, Case/Package=SMC, Forward Voltage=500mV, Max Operating Temperature=125°C, Max Repetitive Reverse Voltage (Vrrm)=40V, Max Reverse Current=500uA, Max Surge Current=100A, Min Operating Temperature=-55°C, Package Quantity=3500, Element Configuration=Single, Forward Current=3A, Max Reverse Leakage Current=500uA, Max Reverse Voltage (DC)=40V, Mount="Surface Mount", Number of Pins=2, Packaging="Tape and Reel", Peak Non-Repetitive Surge Current=100A, Radiation Hardening=No, RoHS Compliant=Yes, Series=-
D4: library part CMP-1426-00010-5, "WL-SMCW SMD chip LED top view monocolor waterclear", Case Code (Metric)=2012, Case Code (Imperial)=0805, Color=Red, Forward Current=100mA, Forward Voltage=1.9V, Manufacturer Lifecycle Status=ACTIVE, Manufacturer Package Identifier="0805 (2012 metric)", Max Junction Temperature (Tj)=95°C, Max Operating Temperature=85°C, Max Reverse Voltage (DC)=5V, Min Operating Temperature=-40°C, Power Dissipation=72mW, Test Current=20mA, Case/Package=0805, Dominant Wavelength=630nm, Height=700µm, Length=2mm, Lens Style="Clear, Rectangular", Lifecycle Status=Production, Luminous Intensity=60mcd, Mount="Surface Mount", Packaging="Tape and Reel", Peak Wavelength=645nm, REACH SVHC=Unknown, Reverse Voltage=5V, RoHS=Compliant, Viewing Angle=140°, Wavelength=630nm, Width=1.25mm, YEOL="1 = Estimated lifetime > 10 years"
D5: library part CMP-1426-00007-4, "WURTH ELEKTRONIK - 150080GS75000 - LED, Green, SMD, 0805, 30 mA, 3.2 V, 520 nm", Case Code (Metric)=2012, Case Code (Imperial)=0805, Color=Green, Forward Current=100mA, Forward Voltage=3.2V, Manufacturer Lifecycle Status=ACTIVE, Manufacturer Package Identifier="0805 (2012 metric)", Max Junction Temperature (Tj)=95°C, Max Operating Temperature=85°C, Max Reverse Voltage (DC)=5V, Min Operating Temperature=-40°C, Power Dissipation=105mW, Test Current=20mA, Case/Package=0805, Dominant Wavelength=525nm, Height=700µm, Length=2mm, Lens Style="Clear, Rectangular", Lifecycle Status=Production, Luminous Intensity=450mcd, Mount="Surface Mount", Packaging="Tape and Reel", Peak Wavelength=515nm, REACH SVHC=Unknown, Reverse Voltage=5V, RoHS=Compliant, Viewing Angle=140°, Wavelength=525nm, Width=1.25mm, YEOL="1 = Estimated lifetime > 10 years"
D6 D7 D8 D9 D10 D11: library part CMP-35283-000007-1, "LED YELLOW CLEAR 0805 SMD", Case Code (Metric)=2012, Case Code (Imperial)=0805, Color=Yellow, Forward Current=2mA, Forward Voltage=1.9V, Lens Color=Colorless, Max Operating Temperature=80°C, Min Operating Temperature=-30°C, Package Quantity=4000, Case/Package=0805, Dominant Wavelength=592nm, Height=0.8mm, Lead Free="Lead Free", Length=2mm, Lens Transparency=Clear, Luminous Intensity=11.5mcd, Mount="Surface Mount", Packaging="Tape and Reel", Test Current=2mA, Viewing Angle=130°, Width=1.2mm, Illumination Color=Yellow
D13: library part CMP-1063-00098-1, "Transient Voltage Suppressor, Micro-Packaged Diode for ESD Protection, 2-Pin SOD-523, Pb-Free, Tape and Reel", Manufacturer="On Semiconductor", ComponentLink1Description="Manufacturer URL", ComponentLink1URL=http://www.onsemi.com/, ComponentLink2Description=Datasheet, ComponentLink2URL=http://www.onsemi.cn/pub_link/Collateral/ESD5Z2.5T1-D.PDF, ComponentLink3Description="Package Specification", ComponentLink3URL=http://www.onsemi.com/pub_link/Collateral/502-01.PDF, DatasheetVersion="Rev. 10", Direction=Unidirectional, Mounting Technology="Surface Mount", Number of Lines=1, PackageDescription="2-Pin SOD, Body 1.2 x 0.8 mm", PackageReference=SOD-523-2-502-01, PackageVersion="Rev. E, 09/2010", Packing="Tape and Reel", PartNumber=ESD5Z3.3T1G, PPK Max (W)=158, RoHS=Pb-Free, V(BR) Min (V)=5, VRWM Max (V)=3.3, IR Max (uA)=0.05
FB1: library part CMP-0220-00032-3, Case/Package=0805, Current Rating=2A, Max Operating Temperature=125°C, Min Operating Temperature=-55°C, Resistance=150mΩ, Tolerance=25%, Core Material=Ferrite, Height=900µm, Length=2mm, NexarPartId=21041532, Packaging="Cut Tape (CT)", RMS Current (Irms)=2A, RoHS=Compliant, Series Resistance=150mΩ, Width=1.2mm, Impedance=600Ω
J1: library part CMP-1502-02670-3, "Terminal Block, Wtb, 2Way, 30-12Awg Rohs Compliant: Yes", Current Rating=16A, Max Operating Temperature=120°C, Min Operating Temperature=-30°C, Voltage Rating=300V, Contact Material="Nickel, Tin", Height=18.1mm, Number of Contacts=2, Number of Rows=1, RoHS=Compliant
J2: library part CMP-1502-01315-4, "Btb Conn, Rcpt, 3Pos, 1Row, 2.54Mm Rohs Compliant: Yes", Contact Resistance=20mΩ, Current Rating=3A, Operating Supply Voltage=250V, Gender=Female, Lead Pitch=2.54mm, Number of Pins=3, Orientation=Vertical, RoHS=Non-Compliant
J3 J10 J17: Package=None, Availability=Unavailable, Price=None
  J3 J10: MF="{'manufacturer': u'Phoenix Contact'}", MP=1803439
  J17: MP=1803442
J4 J11 J12 J15 J16 J19 J20: "Pluggable Header 3.81mm 16AWG 160V 8A 2 Position COMBICON MCV Series", Package=None, Check_prices=https://www.snapeda.com/parts/1803426/Phoenix+Contact/view-part/?ref=eda, MF="Phoenix Contact", MP=1803426, SnapEDA_Link=https://www.snapeda.com/parts/1803426/Phoenix+Contact/view-part/?ref=snap
J6 J7: "Connector;PCB header;12A;250V;2-position;MSTBA 2 5/ 2-G-5 08 VPE500", Package=None, Check_prices=https://www.snapeda.com/parts/1736036/Phoenix+Contact/view-part/?ref=eda, MF="Phoenix Contact", MP=1736036, SnapEDA_Link=https://www.snapeda.com/parts/1736036/Phoenix+Contact/view-part/?ref=snap
J8 J9: "PCB Terminal Screw 5.08mm 16AWG 400V 13.5A 4 Position COMBICON MKDSN Series", Package=None, Check_prices=https://www.snapeda.com/parts/1729144/Phoenix+Contact/view-part/?ref=eda, MF="Phoenix Contact", MP=1729144, SnapEDA_Link=https://www.snapeda.com/parts/1729144/Phoenix+Contact/view-part/?ref=snap
J13 J18: "Pluggable Header 3.81mm 16AWG 160V 8A 5 Position COMBICON MCV Series", Package=None, Check_prices=https://www.snapeda.com/parts/1803455/Phoenix+Contact/view-part/?ref=eda, MF="Phoenix Contact", MP=1803455, SnapEDA_Link=https://www.snapeda.com/parts/1803455/Phoenix+Contact/view-part/?ref=snap
K1 K2 K3 K4 K5 K6: library part CMP-1503-00157-1, "LD-P Relays, 12 V Coil Voltage, 200 mW Nominal Operating Power, -40 to 85 degC, 4-Pin LD-P, Carton, Case, RoHS", Coil Voltage="12 V", Manufacturer=Panasonic, Max Switching Current="5 A AC, 3 A DC", Max Switching Voltage="277 V AC, 30 V DC", Nominal Operating Power="200 mW", ComponentLink1Description="Manufacturer URL", ComponentLink1URL=http://www3.panasonic.biz/ac/ae/index.jsp, ComponentLink2Description=Datasheet, ComponentLink2URL=http://www3.panasonic.biz/ac/e_download/control/relay/power/catalog/mech_eng_ldp.pdf?f_cd=300242, ComponentLink3Description="Package Specification", ComponentLink3URL=http://www3.panasonic.biz/ac/e_download/control/relay/power/catalog/mech_eng_ldp.pdf?f_cd=300242, DatasheetVersion=201402-T, Electrical Life=2x10^5, Mechanical Life(Min.operation)=5x10^6, Mounting Technology="Through Hole", PackageDescription="4-Pin Through Hole Terminal Package, Body 20.5 x 7.2 mm", PackageReference=LD-P-4-2050x720x1530, PackageVersion="ASCTB193E, 02/2014", Packing="Carton, Case", PartNumber=ALDP112W, Pb-Free=True, RoHS=True, Series="LD-P Relays"
L1 L2: library part CMP-1406-00003-3, "Inductor Power Shielded Wirewound 33uH 20% 1KHz Ferrite 3.6A 61mOhm DCR RDL Tray", Ambient Temperature Range High=85°C, Ambient Temperature Range Low=-40°C, Case/Package=Radial, Current Rating=3A, DC Resistance (DCR)=57mΩ, Frequency=10MHz, Max DC Current=3.6A, Max Operating Temperature=125°C, Saturation Current=2.8A, Series Resistance=50mΩ, Test Frequency=1kHz, Tolerance=20%, Inductance=33µH, Core Material=Ferrite, Diameter=11mm, Features=Shielded, Height=11.5mm, Lead Diameter=650µm, Lead Pitch=5mm, Length=11mm, Min Operating Temperature=-40°C, Mount="Radial, Through Hole", Number of Pins=2, REACH SVHC=Unknown, RMS Current (Irms)=3.6A, RoHS=Compliant, Self Resonant Frequency=10MHz, Shielding=Shielded, Width=11mm, Inductance Tolerance=20%
P1: library part CMP-1024-00182-1, "Press Fit Header, Through-hole, Vertical, -55 to 125 degC, 2.54 mm Pitch, 4-Pin, Male, RoHS", Manufacturer=Samtec, Temperature Range="-55 to 125 degC", ComponentLink1Description="Manufacturer URL", ComponentLink1URL=http://www.samtec.com, ComponentLink2Description=Datasheet, ComponentLink2URL=http://www.samtec.com/documents/webfiles/pdf/pht.pdf, ComponentLink3Description="Package Specification", ComponentLink3URL=http://www.samtec.com/documents/webfiles/cpdf/PHT-1XX-XX-X-X-XXX-MKT.pdf, DatasheetVersion=F-214, Mounting Technology=Through-hole, Orientation=Vertical, PackageDescription=".100 Press Fit Socket Assembly", PackageReference=PHT-104-01-X-S, PackageVersion="J, 9/2009", PartNumber=PHT-104-01-L-S, Pitch="2.54 mm", RoHS=True
P2: library part CMP-1502-01068-4, "THT Vertical Pin Header WR-PHD, Pitch 2.54 mm, Single Row, 5 pins", Color=Black, Contact Resistance=20mΩ, Current Rating=3A, Max Operating Temperature=105°C, Min Operating Temperature=-40°C, Operating Supply Voltage=250V, Connector Type="Male Pin", Contact Material=Gold, Contact Mating Length=5.9944mm, Contact Plating=Gold, Gender=Male, Height=8.89mm, Lead Free="Lead Free", Lead Pitch=2.54mm, Mount="Through Hole", Number of Contacts=5, Number of Pins=5, Number of Positions=5, Number of Rows=1, Orientation=Vertical, Packaging=Bulk, Pitch=2.54mm, RoHS=Compliant, Termination=Solder, Voltage Rating=250V
P3: library part CMP-1024-00398-1, "0.025\" SQ Post Header, Through-hole, Vertical, -55 to 125 degC, 2.54 mm Pitch, 6-Pin, Male, RoHS", Manufacturer=Samtec, Temperature Range="-55 to 125 degC", ComponentLink1Description="Manufacturer URL", ComponentLink1URL=http://www.samtec.com, ComponentLink2Description=Datasheet, ComponentLink2URL=http://www.samtec.com/documents/webfiles/pdf/TSW_TH.PDF, ComponentLink3Description="Package Specification", ComponentLink3URL=http://www.samtec.com/documents/webfiles/cpdf/TSW-XXX-XX-XXX-X-XX-XXX-MKT.pdf, DatasheetVersion=F-214, Mounting Technology=Through-hole, Orientation=Vertical, PackageDescription=".025[0.64] SQ. Post Terminal Strip Assembly", PackageReference=TSW-106-23-X-S, PackageVersion="DM, 8/1988", PartNumber=TSW-106-23-F-S, Pitch="2.54 mm", RoHS=True
Q1: library part CMP-65434-000003-1, "OPTOISOLATOR 5KV TRANS 4DIP", Case/Package=DIP, Collector Emitter Breakdown Voltage=80V, Collector Emitter Saturation Voltage=200mV, Current Transfer Ratio=600%, Forward Current=50mA, Forward Voltage=1.4V, Max Operating Temperature=100°C, Max Power Dissipation=200mW, Min Operating Temperature=-30°C, Package Quantity=2000, Reverse Breakdown Voltage=6V, Input Current=20mA, Isolation Voltage=5kV, Collector Emitter Voltage (VCEO)=80V, Fall Time=18000ns, Max Collector Current=50mA, Max Input Current=50mA, Mount="Through Hole", Number of Channels=1, Number of Elements=1, Number of Pins=4, Output Current per Channel=50mA, Output Voltage=80V, Packaging=Sleeve, Power Dissipation=200mW, Radiation Hardening=No, Rise Time=18000ns
R1 R5 R6 R15 R20 R21 R22 R23 R24 R25: library part CMP-04015-036100-1, "2.2kΩ ±0.1% 0.125W, 1/8W Chip Resistor 0805 (2012 Metric) Moisture Resistant Thin Film"
R2: library part CMP-1013-00066-1, "470R 0.125W 5% 0805 (2012 Metric)  SMD", Case-EIA=0805, Case-Metric=2012, Power="0.125 W", Tolerance="5 %", Technology=SMT
R3 R9 R11 R13 R18 R31 R46: library part CMP-03211-002989-1, "CRGCQ 0805 10K 5%", Ambient Temperature Range High=+70°C, Manufacturer="TE Connectivity", Package=CRGCQ0805, Power Rating=0.125W, Resistance=10KΩ, Temperature="-55°C to +155°C", Temperature Coefficient=±100ppm/°C, Temperature Range High=+155°C, Temperature Range Low=-55°C, Tolerance=0.05, Voltage Rating=150V, Automotive=Yes, Automotive Grade="Grade 914", Category=Res, ComponentLink2Description=Datasheet, ComponentLink2URL=https://www.te.com/commerce/DocumentDelivery/DDEController?Action=showdoc&DocId=Data+Sheet%7F1773204-3%7F1%7Fpdf%7FEnglish%7FENG_DS_1773204-3_1.pdf%7F4-2176341-923, Composition="Thick Film", Device Class L1="Passive Components", Device Class L2=Resistors, Device Class L3="Chip SMD Resistors", Digikey Description="CRGCQ 0805 10K 5%", Height=0.65mm, Lead Free=Yes, Manufacturer Part Number=CRGCQ0805J10K, Mouser Description="Res Thick Film 0805 10K Ohm 5% 0.125W(1/8W) ±100ppm/C Pad SMD Automotive T/R", Octopart=https://octopart.com/crgcq0805j10k-te+connectivity-91018201, RoHS=TRUE, Series=CRGCQ, Ipc Land Pattern Name=RESC200125X55
R4 R35: library part CMP-03211-004613-1, "CRGCQ 0805 1K0 1%", Ambient Temperature Range High=+70°C, Manufacturer="TE Connectivity", Package=CRGCQ0805, Power Rating=0.125W, Resistance=1KΩ, Temperature="-55°C to +155°C", Temperature Coefficient=±100ppm/°C, Temperature Range High=+155°C, Temperature Range Low=-55°C, Tolerance=0.01, Voltage Rating=150V, Automotive=Yes, Automotive Grade="Grade 685", Category=Res, ComponentLink2Description=Datasheet, ComponentLink2URL=https://www.te.com/commerce/DocumentDelivery/DDEController?Action=showdoc&DocId=Data+Sheet%7F1773204-3%7F1%7Fpdf%7FEnglish%7FENG_DS_1773204-3_1.pdf%7F4-2176341-694, Composition="Thick Film", Device Class L1="Passive Components", Device Class L2=Resistors, Device Class L3="Chip SMD Resistors", Digikey Description="CRGCQ 0805 1K0 1%", Height=0.65mm, Lead Free=Yes, Manufacturer Part Number=CRGCQ0805F1K0, Octopart=https://octopart.com/crgcq0805f1k0-te+connectivity-91018154, RoHS=TRUE, Series=CRGCQ, Ipc Land Pattern Name=RESC200125X55
R7: library part CMP-03412-037390-1, "RES SMD 120 OHM 5% 1/8W 0805", Manufacturer=Yageo, Package=AC0805, Power Rating=1/8W, Resistance=120Ω, Temperature="-55°C to +155°C", Temperature Range High=+155°C, Temperature Range Low=-55°C, Tolerance=0.05, Voltage Rating=150V, Automotive=Yes, Automotive Grade="Grade 0", Category=Res, ComponentLink2Description=Datasheet, ComponentLink2URL=http://www.yageo.com/documents/recent/PYu-AC_51_RoHS_L_6.pdf, Composition="Thick Film", Device Class L1="Passive Components", Device Class L2=Resistors, Device Class L3="Chip SMD Resistors", Digikey Description="RES SMD 120 OHM 5% 1/8W 0805", Footprint Url=http://www.yageo.com/exep/pages/download/literatures/PYu-R_Mount_10.pdf, Height=0.6mm, Lead Free=Yes, Manufacturer Part Number=AC0805JR-07120RL, Mouser Description="Thick Film Resistors - SMD 1/8W 120ohm 5% AEC-Q200", Octopart=https://octopart.com/ac0805jr-07120rl-yageo-52448213, RoHS=TRUE, Series=AC, Ipc Land Pattern Name=RESC200125X50
R8: library part CMP-03412-037889-1, "Anti-Sulfurated Chip Resistor Automotive Grade 1MΩ 1% 0.125W ±100ppm/°C 0805", Case/Package=0805, Max Operating Temperature=155°C, Max Power Dissipation=125mW, Min Operating Temperature=-55°C, Resistance=1MR, Resistor Type="Thick Film", Temperature Coefficient=100ppm/°C, Tolerance=1%, Features="Moisture Resistant", Height=0.024inch, Length=0.079inch, Number of Terminations=2, Packaging="Tape and Reel", RoHS Compliant=Yes, Series=AF, Width=0.049inch
R10: library part CMP-03211-000816-1, "CRGCQ 0805 100K 1%", Ambient Temperature Range High=+70°C, Manufacturer="TE Connectivity", Package=CRGCQ0805, Power Rating=0.125W, Resistance=100KΩ, Temperature="-55°C to +155°C", Temperature Coefficient=±100ppm/°C, Temperature Range High=+155°C, Temperature Range Low=-55°C, Tolerance=0.01, Voltage Rating=150V, Automotive=Yes, Automotive Grade="Grade 1141", Category=Res, ComponentLink2Description=Datasheet, ComponentLink2URL=https://www.te.com/commerce/DocumentDelivery/DDEController?Action=showdoc&DocId=Data+Sheet%7F1773204-3%7F1%7Fpdf%7FEnglish%7FENG_DS_1773204-3_1.pdf%7F4-2176341-1150, Composition="Thick Film", Device Class L1="Passive Components", Device Class L2=Resistors, Device Class L3="Chip SMD Resistors", Digikey Description="CRGCQ 0805 100K 1%", Height=0.65mm, Lead Free=Yes, Manufacturer Part Number=CRGCQ0805F100K, Mouser Description="Res Thick Film 0805 100K Ohm 1% 0.125W(1/8W) ±100ppm/C Pad SMD Automotive T/R", Octopart=https://octopart.com/crgcq0805f100k-te+connectivity-91018138, RoHS=TRUE, Series=CRGCQ, Ipc Land Pattern Name=RESC200125X55
R12 R14 R26 R27 R28 R29 R30 R32 R33 R34 R36 R37 R47: library part CMP-26527-001731-1, "100Ω ±1% 0.125W 0805 Thick Film Chip Resistor AEC-Q200 compliant", Case Code (Metric)=2012, Case Code (Imperial)=0805, Max Operating Temperature=155°C, Max Power Dissipation=125mW, Min Operating Temperature=-55°C, Power Rating=250mW, Resistance=100R, Resistor Type="Thick Film", Temperature Coefficient=100ppm/°C, Tolerance=1%, Case/Package=0805, Construction=Rectangular, Contact Plating=Tin, Depth=1.25mm, Features="Automotive AEC-Q200", Height=0.026inch, Lead Free="Lead Free", Length=2mm, Military Standard=Not, Mount="Surface Mount", Number of Terminations=2, Packaging="Tape and Reel", Radiation Hardening=No, RoHS Compliant=Yes, Series=RMCF, Size Code=0805, Width=0.049inch
R16 R17 R19: library part CMP-2001-04488-2, "RES SMD 220 OHM 1% 1/8W 0805", Manufacturer=Yageo, Package=AC0805, Power Rating=1/8W, Resistance=220Ω, Temperature="-55°C to +155°C", Temperature Range High=+155°C, Temperature Range Low=-55°C, Tolerance=0.01, Voltage Rating=150V, Automotive=Yes, Automotive Grade="Grade 0", Category=Res, ComponentLink2Description=Datasheet, ComponentLink2URL=http://www.yageo.com/documents/recent/PYu-AC_51_RoHS_L_6.pdf, Composition="Thick Film", Device Class L1="Passive Components", Device Class L2=Resistors, Device Class L3="Chip SMD Resistors", Digikey Description="RES SMD 220 OHM 1% 1/8W 0805", Footprint Url=http://www.yageo.com/exep/pages/download/literatures/PYu-R_Mount_10.pdf, Height=0.6mm, Lead Free=Yes, Manufacturer Part Number=AC0805FR-07220RL, Mouser Description="Thick Film Resistors - SMD 1/8W 220ohm 1% AEC-Q200", Octopart=https://octopart.com/ac0805fr-07220rl-yageo-26041145, RoHS=TRUE, Series=AC, Ipc Land Pattern Name=RESC200125X50
SW1: library part CMP-1453-00002-5, "Switch Tactile Spst-no 0.05A 12V", Contact Current Rating=50mA, Manufacturer Lifecycle Status=ACTIVE, Max Operating Temperature=85°C, Min Operating Temperature=-40°C, Voltage Rating=12V, Insulation Resistance=100MΩ, Actuator Material="Liquid Crystal Polymer, Polymer", Contact Material=Steel, Contact Plating=Silver, Current Rating=50mA, Diameter=3.5mm, Height=4.3mm, Length=6.2mm, Lifecycle Status=Production, Mechanical Life=200kcycles, Mount="Through Hole", Packaging=Bulk, REACH SVHC=No, RoHS=Compliant, Switch Function=Off-Mom, Switch Travel=250µm, Termination="PC Pin", Throw Configuration=SPST, Width=6.2mm, YEOL="1 = Estimated lifetime > 10 years", Illumination Type="Illuminated, Non-Illuminated"
U1: library part CMP-04918-000394-1, "IC REG BUCK 3.3V 3A TO263-5", Case/Package=TO-263-5, Max Operating Temperature=125°C, Max Output Current=3A, Max Input Voltage=40V, Min Operating Temperature=-40°C, Min Output Voltage=3.3V, Min Supply Voltage=4.5V, Operating Supply Current=5mA, Package Quantity=500, Switching Frequency=173kHz, Efficiency=73%, Lead Free="Contains Lead", Min Input Voltage=4.5V, Mount="Surface Mount", Nominal Output Voltage=3.3V, Number of Outputs=1, Number of Pins=5, Operating Supply Voltage=40V, Output Configuration=Positive, Output Current=3A, Output Type=Fixed, Output Voltage=3.3V, Packaging="Cut Tape", Quiescent Current=5mA, Radiation Hardening=No, REACH SVHC="No SVHC", RoHS Compliant=Yes, Series=LM2596, Synchronous Rectifier=No, Weight=0.056128oz
U2: library part CMP-0069-00282-2, "SIMPLE SWITCHER® Power Converter 150 KHz 3A Step-Down Voltage Regulator, 5-pin TO-263", Manufacturer="National Semiconductor", PackageTopMarking="NSUZXYTTE#*LM2596S*-5.0 P+", PowerWise=N, Code_JEDEC=MO-169-AB, ComponentLink1Description="LM2596 Datasheet", ComponentLink1URL=http://www.national.com/ds/LM/LM2596.pdf, ComponentLink2Description="LM2596 Web Page", ComponentLink2URL=http://www.national.com/pf/LM/LM2596.html, ComponentLink3Description="TS5B Package Page", ComponentLink3URL=http://www.national.com/packaging/folders/ts5b.html, CompType=Switcher, DatasheetVersion=May-2002, PackageDescription="TO-263, Molded, .400 x .390 x .180in, 5 Lead, .067in Pitch, Surface Mount", PackageReference=TS5B, PackageVersion="revD, Apr-2005", PinCount=5, RevisionNote="Component URLs added", RoHS=N
U3: library part CMP-0315-00015-3, "IC TRANSCEIVER HALF 1/1 8SOIC", Case/Package=D, Max Operating Temperature=85°C, Max Supply Current=17mA, Max Supply Voltage=3.6V, Min Operating Temperature=-40°C, Min Supply Voltage=3V, Operating Supply Voltage=3.3V, Package Quantity=1, Contact Plating=Gold, Data Rate=1Mbps, Lead Free="Lead Free", Nominal Supply Current=17mA, Number of Drivers=1, Number of Pins=8, Number of Receive Buffers=1, Number of Receivers=1, Number of Transceivers=1, Number of Transmit Buffers=1, Number of I/Os=2, Packaging="Tape and Reel", Radiation Hardening=No, REACH SVHC="No SVHC", Termination=SMD/SMT, Weight=0.002561oz
U4: library part CMP-0237-00201-3, "ARM Cortex-M3 32-bit MCU, 512 KB Flash, 64 KB Internal RAM, 51 I/Os, 64-pin LQFP, -40 to 85 degC, Tray", Operating Frequency(F) (Processor speed) (MHz)=72, Supply Voltage(Vcc) min (V)=2, I/Os (High Current)=51, A/D Converter="3x12-bit (16 Channel)", ComponentLink1Description="Manufacturer URL", ComponentLink1URL=http://www.st.com/web/en/home.html, ComponentLink2Description=Datasheet, ComponentLink2URL=http://www.st.com/st-web-ui/static/active/en/resource/technical/document/datasheet/CD00191185.pdf, ComponentLink3Description="Package Specification", ComponentLink3URL=http://www.st.com/st-web-ui/static/active/en/resource/technical/document/datasheet/DM00037051.pdf, Core="ARM Cortex-M3", D/A Converter="2x12-bit (2 Channel)", DatasheetVersion="Rev. 8", FLASH Size (Prog) (kB)=512, Mounting Technology="Surface Mount", PackageDescription="64-Pin Low Profile Quad Flat Package, 10 x 10 mm Body, 0.5 mm Pitch", PackageReference=LQFP64, PackageVersion="Rev. 4, 06/2013", Packing=Tray, PartNumber=STM32F103RET6, Internal RAM Size (kB)=64
U5: library part CMP-0188-01008-2, "12-Bit Quad Digital-to-Analog Converter with EEPROM Memory, 10-pin MSOP, Extended Temperature", ComponentLink1Description="Manufacturer URL", ComponentLink1URL=http://www.microchip.com/, ComponentLink2Description=Datasheet, ComponentLink2URL=http://ww1.microchip.com/downloads/en/DeviceDoc/22187E.pdf, ComponentLink3Description="Package Specification", ComponentLink3URL=http://www.microchip.com/stellent/groups/techpub_sg/documents/packagingspec/en012702.pdf, DatasheetVersion="revE, Oct-2010", PackageDescription="10-Lead Plastic Micro Small Outline Package (UN) [MSOP]", PackageReference=MSOP-UN10, PackageVersion="revBB, Aug-2009", RevisionNote="URLs added. DatasheetVersion updated."